# Altium PCB Janus_v1_1.PcbDoc
Units mm, origin at the board's own origin, x right, y up, seen from the top; angles counter-clockwise.
Board outline 71.5 x 35.5 mm, 4 copper layers (Top Layer, GND, Power, Bottom Layer), stack 0.602 mm thick; 100 components, 62 nets, 339 pads, 194 vias.
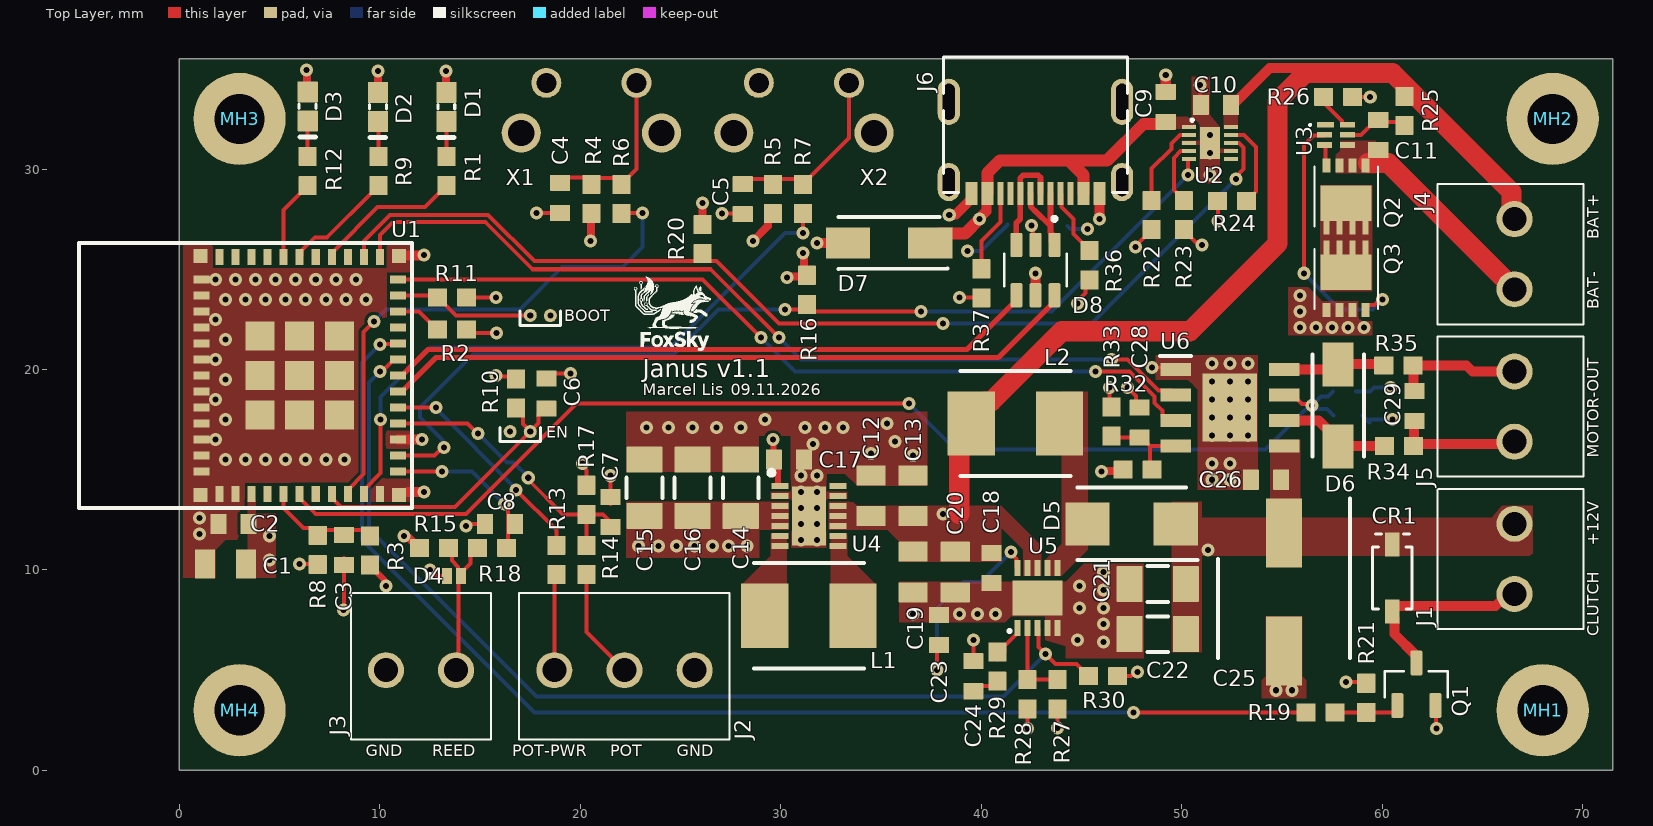
[diagram p0: Top Layer view]
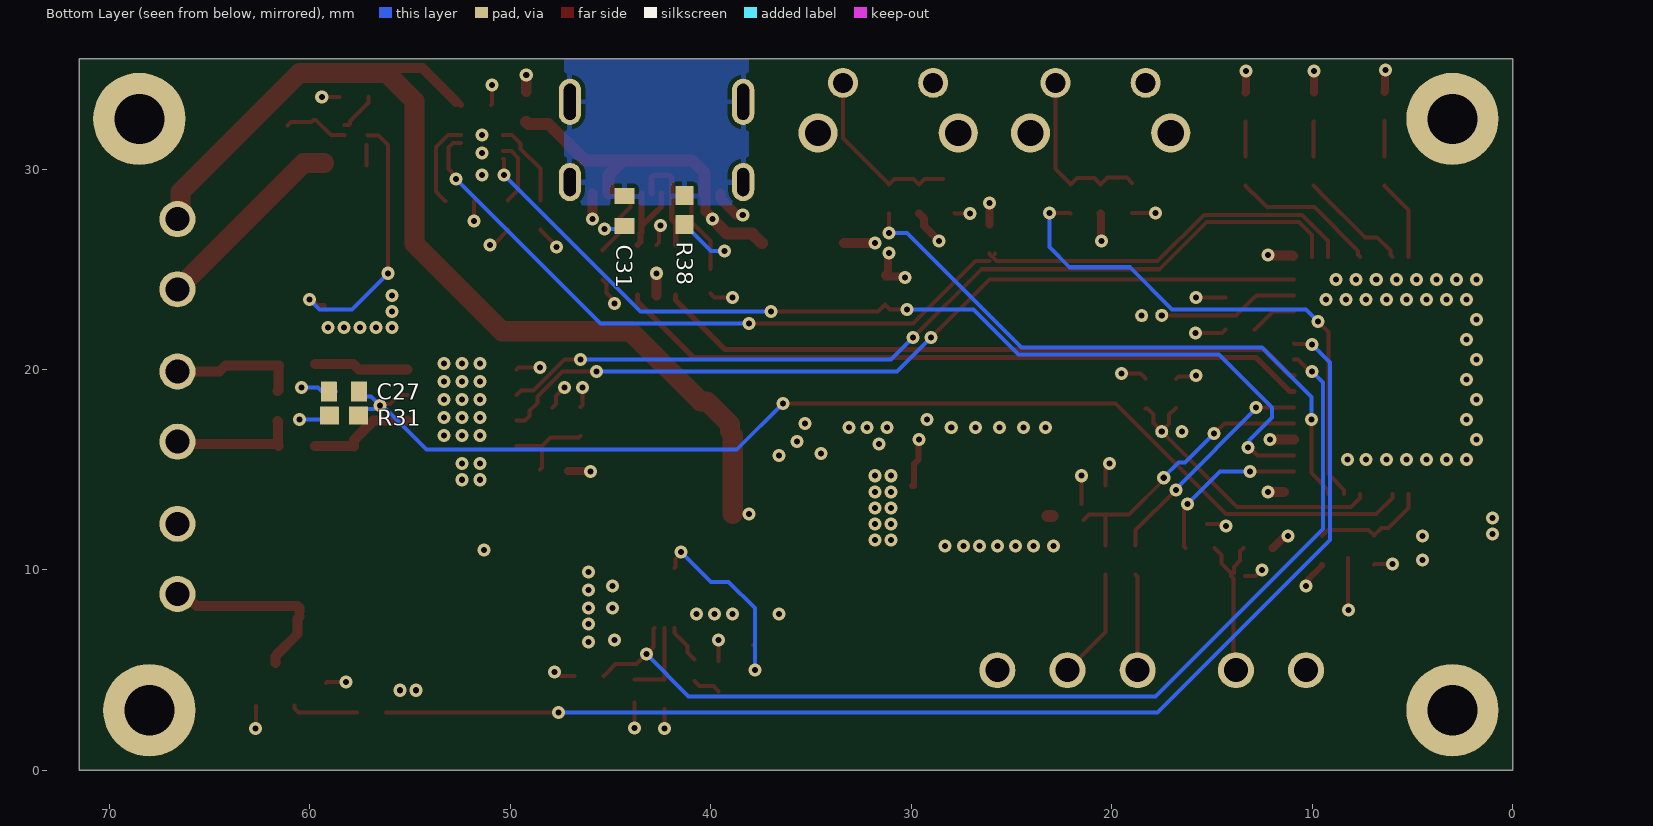
[diagram p1: Bottom Layer view, seen from below]
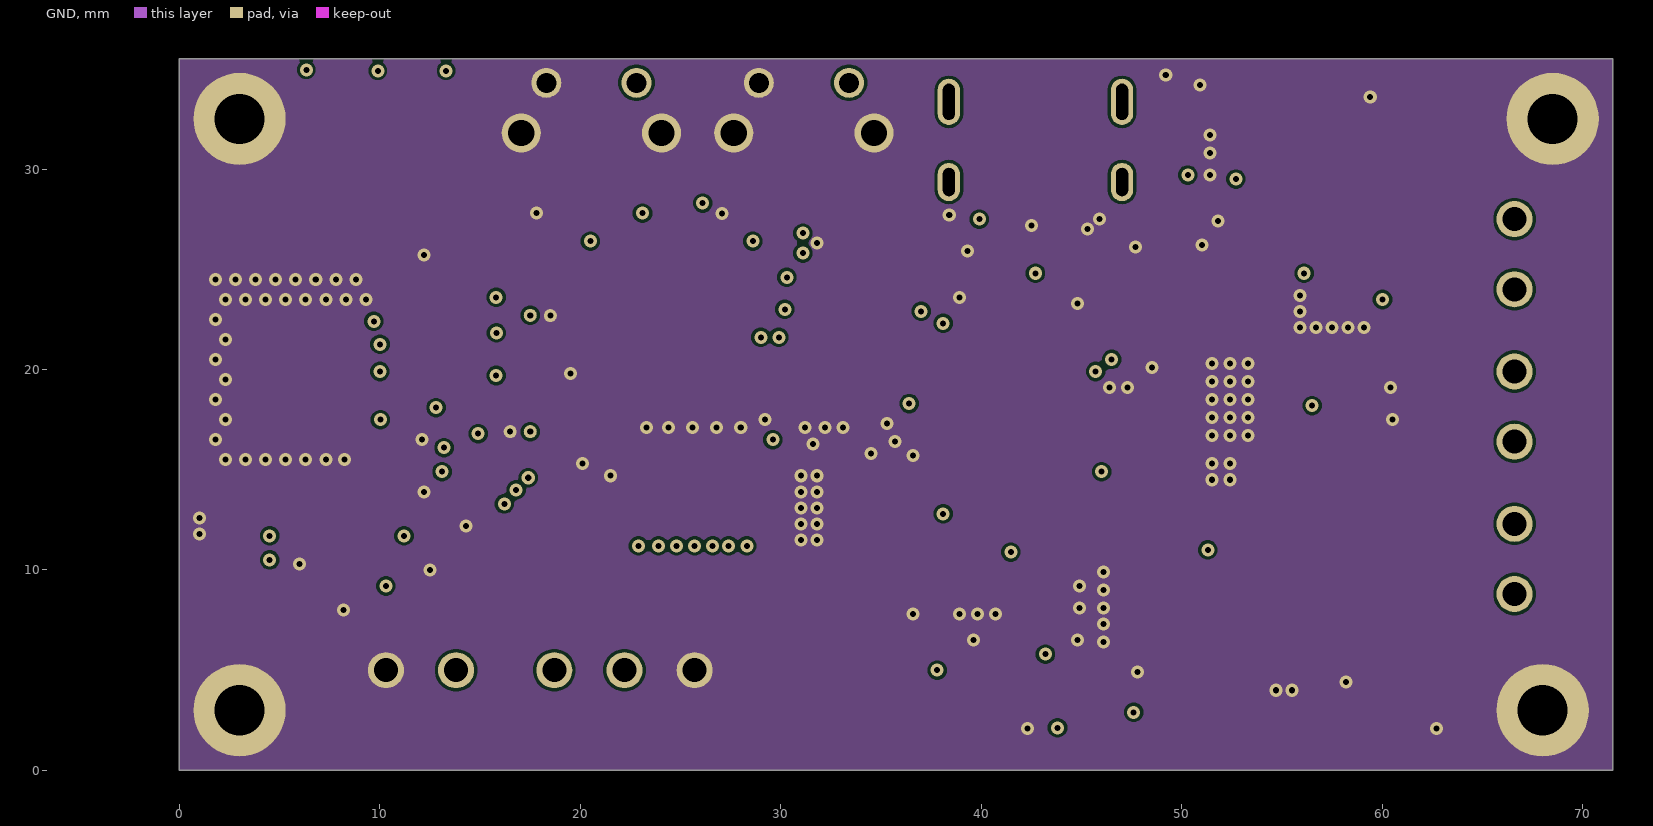
[diagram p2: GND]
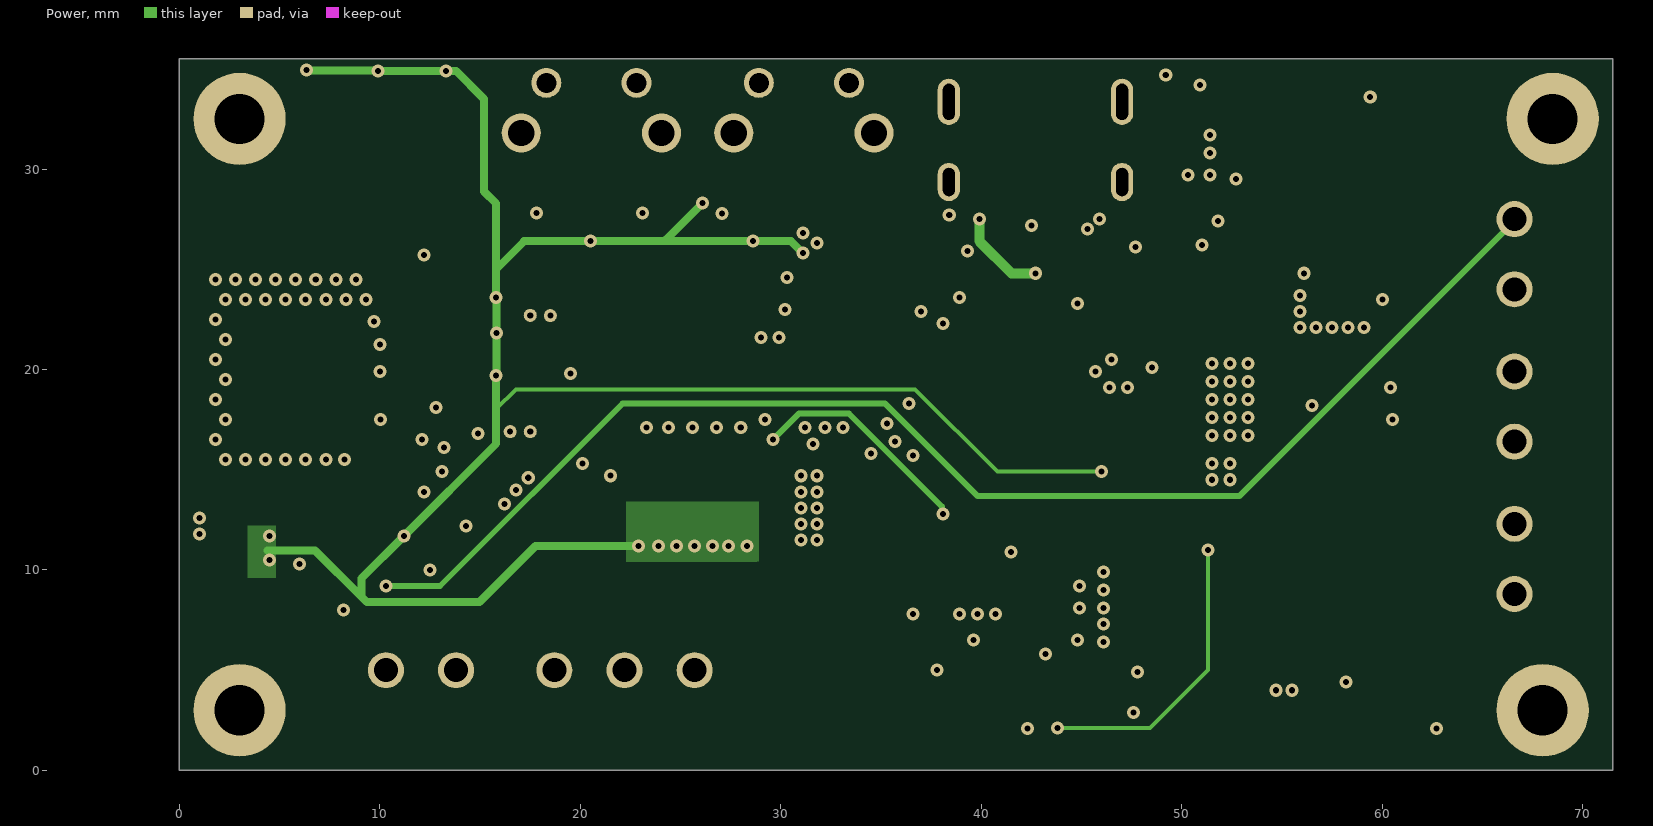
[diagram p3: Power]
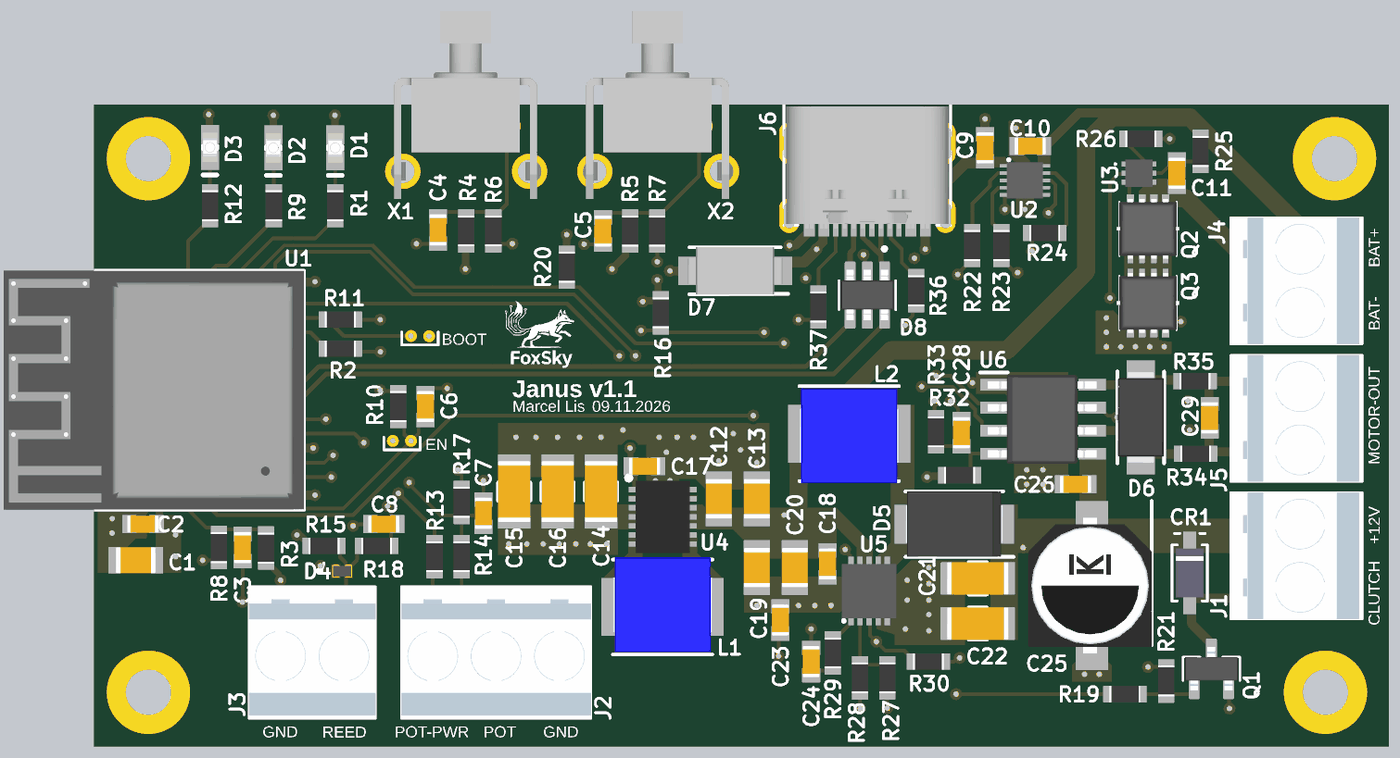
[diagram p4: 3D render of the assembled board from above, using the file's embedded part models]
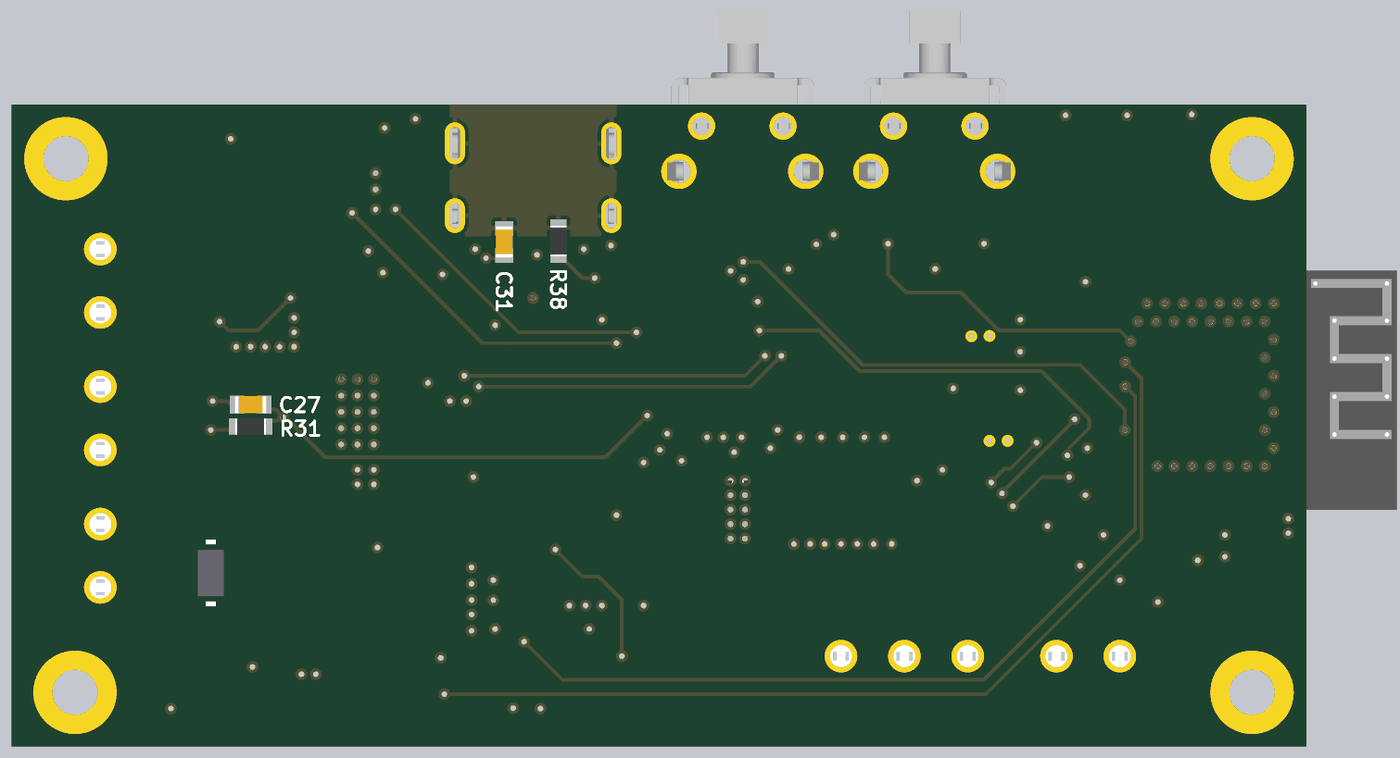
[diagram p5: 3D render of the assembled board from below, using the file's embedded part models]

## Layer stack, top to bottom
Top Solder: solder mask 0.0102, Solder Resist, Dk 3.5
Top Layer: signal copper 0.035
Dielectric 2: prepreg 0.0711, PP-006, Dk 4.1
GND: signal copper 0.035
Dielectric 1: dielectric 0.32, FR-4, Dk 4.8
Power: signal copper 0.035
Dielectric 3: prepreg 0.0711, PP-006, Dk 4.1
Bottom Layer: signal copper 0.035
Bottom Solder: solder mask 0.0102, Solder Resist, Dk 3.5

## Board outline
0,0 0,35.5 71.5,35.5 71.5,0

## Design rules (kind name [scope] priority, off if disabled: settings)
Clearance [All] p1: gap=0.15 ignorepadtopadclearanceinfootprint=TRUE except(0.1: Text-Text Text-Hole)
DiffPairsRouting [InDifferentialPair('USB')] p1: maxlimit=0.203 minlimit=0.203 mostfreqgap=0.203 toplayer_minwidth=0.283 toplayer_maxwidth=0.283 toplayer_prefwidth=0.283 midlayer1_minwidth=0.283 midlayer1_maxwidth=0.283 midlayer1_prefwidth=0.283 midlayer2_minwidth=0.283 midlayer2_maxwidth=0.283 midlayer2_prefwidth=0.283 bottomlayer_minwidth=0.283 bottomlayer_maxwidth=0.283 bottomlayer_prefwidth=0.283 maxuncoupledlength=12.7
PolygonConnect ThermalRelief [InNet('NetC31_2')] p1: thpad.connectstyle=Relief thpad.reliefconductorwidth=0.254 thpad.reliefentries=4 thpad.polygonreliefangle="90 Angle" thpad.airgapwidth=0.2 smdpad.connectstyle=Relief smdpad.reliefconductorwidth=0.254 smdpad.reliefentries=4 smdpad.polygonreliefangle="90 Angle" smdpad.airgapwidth=0.2 via.connectstyle=Direct via.reliefconductorwidth=0.254 via.reliefentries=4 via.polygonreliefangle="90 Angle" via.airgapwidth=0.2
PolygonConnect [All] p2: connectstyle=Direct reliefconductorwidth=0.254 reliefentries=4 polygonreliefangle="90 Angle" airgapwidth=0.254
RoutingVias [All] p1: holewidth=0.3 width=0.65 viastyle="Through Hole" minholewidth=0.3 minwidth=0.65 maxholewidth=0.3 maxwidth=0.65
SolderMaskExpansion SolderMaskExpansion_1 [IsVia] p1: expansion=0 istentingtop=TRUE
SolderMaskExpansion [All] p2: expansion=0 istentingtop=FALSE
SupplyNets "Schematic Supply Nets_5" [InNet('+3V3')] p1: voltage=0.000
SupplyNets "Schematic Supply Nets_4" [InNet('CELL-')] p2: voltage=0.000
SupplyNets "Schematic Supply Nets_3" [InNet('GND')] p3: voltage=0.000
SupplyNets "Schematic Supply Nets_2" [InNet('+12V')] p4: voltage=0.000
SupplyNets "Schematic Supply Nets_1" [InNet('CELL+')] p5: voltage=0.000
SupplyNets "Schematic Supply Nets" [InNet('+V_USB')] p6: voltage=0.000
Width [All] p1: maxlimit=2 minlimit=0.2 preferedwidth=0.2 minimp=50.000000 maximp=50.000000 favimp=50.000000
29 further rules are at their usual default settings.

## Classes and differential pairs
component class USBC_CONNECTOR: C31 D7 D8 J6 R36 R37 R38
component class POWER_SUPPLY: C12 C13 C14 C15 C16 C17 C18 C19 C20 C21 C22 C23 C24 D5 L1 L2 R27 R28 R29 R30 U4 U5
component class POWER_CELL_PROTECTION_AND_CHARGING: C9 C10 C11 J4 Q2 Q3 R22 R23 R24 R25 R26 U2 U3
component class MOTOR_DRIVER: C25 C26 C27 C28 C29 D6 J5 R31 R32 R33 R34 R35 U6
component class MCU: C1 C2 C3 C4 C5 C6 C7 C8 CR1 D1 D2 D3 D4 J1 J2 J3 Q1 R1 R2 R3 R4 R5 R6 R7 R8 R9 R10 R11 R12 R13 R14 R15 R16 R17 R18 R19 R20 R21 U1 X1 X2
component class FoxSky.Janus: MH1 MH2 MH3 MH4
differential pair USB: +USB_P -USB_N

## Components (designator, comment, footprint, x,y, rotation, side; value= is the part's Value field where it differs from the comment)
C1 "10u" C0805 2.3,10.3 r0 top
C2 "100n" C0603 2.7,12.3 r0 top
C3 "100n" C0603 8.2,11 r90 top
C4 "100n" C0603 18.99,28.561 r90 top
C5 "100n" C0603 28.1,28.5 r90 top
C6 "1u" C0603 18.3,18.8 r270 top
C7 "47n" C0603 21.5,12.9 r270 top
C8 "10n" C0603 16,12.3 r0 top
C9 "1u" C0603 49.2,33.1 r270 top
C10 "1u" C0603 51.7,33.2 r0 top
C11 "100n" C0603 59.8,31.7 r90 top
C12 "10u" C0805 34.5,13.7 r270 top
C13 "10u" C0805 36.6,13.7 r270 top
C14 "22u" C1206 28,14.1 r270 top
C15 "22u" C1206 23.2,14.1 r270 top
C16 "22u" C1206 25.6,14.1 r270 top
C17 "100n" C0603 30.4,15.5 r180 top
C18 "1u" C0603 40.5,10.1 r90 top
C19 "10u" C0805 36.6,9.9 r90 top
C20 "10u" C0805 38.7,9.9 r90 top
C21 "22u" C1206 48.8,9.3 r0 top
C22 "22u" C1206 48.8,6.8 r0 top
C23 "100n" C0603 37.9,7 r270 top
C24 "1n2" C0603 39.6,4.7 r270 top
C25 "100u" CAPAE660X800N 55.1,8.9 r270 top
C26 "100n" C0603 54.2,14.5 r0 top
C27 "10n" C0603 58.3,18.9 r180 bottom
C28 "100n" C0603 47.9,17.35 r270 top
C29 "100n" C0603 61.603,18.174 r270 top
C31 "10n" C0603 44.3,27.9 r90 bottom
CR1 "1N4148W-E3-08" CR_48W-E3-08_VIS 60.5,9.6 r270 top
D1 "LED0603" LED0603 13.315,33.1 r90 top
D2 "LED0603" LED0603 9.9,33.1 r90 top
D3 "LED0603" LED0603 6.4,33.125 r90 top
D4 "PESD5V0V1BL_315" DIO_PESD5V0S1UL,315 13.7,9.7 r0 top
D5 "SS24-E3_52T" DIOM5436X244N 47.5,12.3 r180 top
D6 "SMAJ15CA" DIONM5126X265N 57.8,18.2 r270 top
D7 "SMAJ5.0A" DIOM5026X229N 35.4,26.3 r180 top
D8 "USBLC6-2SC6" SOT95P280X145-6N 42.7,24.959 r270 top
J1 "1546551-2" 15465512 66.6,12.3 r270 top
J2 "1546551-3" 15465513 18.7,5 r0 top
J3 "1546551-2" 15465512 13.8,5 r180 top
J4 "1546551-2" 15465512 66.6,27.5 r270 top
J5 "1546551-2" 15465512 66.6,19.9 r270 top
J6 "USB4215-03-A" CONN_8p94X6p5X3p16_12L_GCC 42.7,32.2 r180 top
L1 "SRP5030WA-1R5M" INDPM5552X300N 31.399,7.713 r180 top
L2 "SRP5030WA-3R3M" INDPM5552X300N 41.7,17.3 r0 top
MH1 "M2 Plated Hole" "M2 Plated Hole"#1 65.752,2.311 r0 top
MH2 "M2 Plated Hole" "M2 Plated Hole"#2 71,32.5 r0 top
MH3 "M2 Plated Hole" "M2 Plated Hole"#3 3.7,31.4 r0 top
MH4 "M2 Plated Hole" "M2 Plated Hole"#4 3.4,6.2 r0 top
Q1 "AO3400" SOT95P240X111-3N 61.7,4.3 r90 top
Q2 "CSD17581Q3A" CSD17581Q3A 58.2,28.776 r270 top
Q3 "CSD17581Q3A" CSD17581Q3A 58.2,24.374 r90 top
R1 "330R" R0603 13.315,29.9 r90 top
R2 "10k" R0603 13.6,22 r0 top
R3 "1M" R0603 9.5,10.975 r270 top
R4 "10k" R0603 20.546,28.51 r270 top
R5 "10k" R0603 29.6,28.5 r90 top
R6 "1k" R0603 22.049,28.506 r270 top
R7 "1k" R0603 31.1,28.5 r90 top
R8 "1M" R0603 6.9,11 r90 top
R9 "330R" R0603 9.923,29.9 r90 top
R10 "10k" R0603 16.8,18.8 r90 top
R11 "10k" R0603 13.6,23.6 r0 top
R12 "330R" R0603 6.4,29.9 r90 top
R13 "220R" R0603 18.8,10.5 r270 top
R14 "4k7" R0603 20.3,10.5 r90 top
R15 "1M" R0603 12.7,11.1 r0 top
R16 "100k" R0603 31.3,23.975 r90 top
R17 "1M" R0603 20.3,13.5 r90 top
R18 "10k" R0603 15.6,11.1 r180 top
R19 "100R" R0603 56.925,2.9 r0 top
R20 "100k" R0603 26.1,26.5 r270 top
R21 "100k" R0603 59.2,3.625 r270 top
R22 "1k" R0603 48.5,27.7 r90 top
R23 "2k" R0603 50.1,27.7 r90 top
R24 "10k" R0603 52.5,28.4 r0 top
R25 "330R" R0603 61.1,32.9 r90 top
R26 "2k2" R0603 57.8,33.6 r180 top
R27 "158k" R0603 43.8,3.8 r270 top
R28 "18k" R0603 42.3,3.8 r90 top
R29 "68k" R0603 40.8,5.175 r90 top
R30 "100k" R0603 46.075,4.7 r180 top
R31 "2k7" R0603 58.3,17.7 r180 bottom
R32 "100k" R0603 47.8,15 r180 top
R33 "361k" R0603 46.5,17.4 r270 top
R34 "0R" R0603 60.83,16.18 r0 top
R35 "0R" R0603 60.8,20.2 r0 top
R36 "5k1" R0603 45.4,25.2 r90 top
R37 "5k1" R0603 40,24.3 r90 top
R38 "1M" R0603 41.304,27.95 r90 bottom
U1 "ESP32-C6-MINI-1-H8" ESP32C6MINI1H8 3.3,19.7 r90 top
U2 "BQ24040DSQT" SON40P200X200X80-11N 51.4,31.3 r0 top
U3 "BQ29728DSER" TPS610985DSET 57.7,31.7 r270 top
U4 "TPS63021DSJR" SON50P300X400X100-15N-D 31.4,12.7 r0 top
U5 "TPS61087DSCR" SON50P300X300X80-11N-D 42.8,8.6 r90 top
U6 "DRV8251ADDAR" SOIC127P600X170-9N 52.4,18.1 r0 top
X1 "FSMRACDAH" FSMRACDAH 22.8,34.34 r180 top
X2 "FSMRACDAH" FSMRACDAH 33.4,34.34 r180 top

## Footprints (in the part's own frame and the unit in brackets; to place one, negate y for a bottom-side part, rotate by r counter-clockwise, add the part's x,y. Pads: shape width x height; smd on the part's side, far side on the other; paste and mask are expansions set on the pad)
15465512 [mm]
  round 1.8 hole 1.2: 1(0,0) 2(3.5,0)
  silkscreen extent -1.75,-3.85 5.25,3.45, body extent -1.75,-3.85 5.25,3.45, height 8.51
15465513 [mm]
  round 1.8 hole 1.2: 1(0,0) 2(3.5,0) 3(7,0)
  silkscreen extent -1.75,-3.45 8.75,3.85, body extent -1.75,-3.45 8.75,3.85, height 8.54
C0603 [mm] "Generic 0603 SMD Ceramic Capacitor Footprint"
  rrect5% 0.8x1 smd: 1(-0.75,0) 2(0.75,0)
  body extent -0.87,-0.48 0.87,0.48, height 0.95
C0805 [mm] "Generic 0805 SMD Ceramic Capacitor Footprint"
  rrect5% 1x1.45 smd: 1(-1.016,0) 2(1.016,0)
  body extent -1.1,-0.72 1.1,0.72, height 1.45
C1206 [mm] "Generic 1206 SMD Ceramic Capacitor Footprint"
  rrect5% 1.3x1.8 smd: 1(-1.4,0) 2(1.4,0)
  silkscreen extent -0.5,-0.89 0.5,0.89, body extent -1.7,-0.9 1.7,0.9, height 1.8
CAPAE660X800N [mm]
  rect 3.45x1.8 smd: 1(-2.95,0) 2(2.95,0)
  silkscreen extent -4.67,-3.3 3.3,3.3, body extent -3.75,-3.5 3.75,3.3, height 8.01
CONN_8p94X6p5X3p16_12L_GCC [mm]
  oval 1.108x1.908 hole 0.6 slot 1.4 at 90 deg paste-2539.97 mask+0: 13(-4.32,2.849) 14(4.32,2.849)
  oval 1.108x2.308 hole 0.6 slot 1.8 at 90 deg paste-2539.97 mask+0: 15(-4.32,-1.151) 16(4.32,-1.151)
  rect 0.6x1.15 smd paste+0 mask+0: A1/B12(-3.2,3.424) A4/B9(-2.4,3.424) B1/A12(3.2,3.424) B4/A9(2.4,3.424)
  rect 0.3x1.15 smd paste+0 mask+0: A5(-1.25,3.424) A6(-0.25,3.424) A7(0.25,3.424) A8(1.25,3.424) B5(1.75,3.424) B6(0.75,3.424) B7(-0.75,3.424) B8(-1.75,3.424)
  silkscreen extent -4.6,-3.38 4.6,3.38, body extent -4.47,-3.19 4.47,3.56, height 3.23
CR_48W-E3-08_VIS [mil]
  rect 47.56x28.36 smd paste+0 mask+0: 1(-66,0) 2(66,0)
  silkscreen extent -86,-39 61,39, body extent -73,-31 73,31, height 22
CSD17581Q3A [mm]
  rect 0.7x0.4 smd: 1(-1.402,0.975) 2(-1.402,0.325) 3(-1.402,-0.325) 4(-1.402,-0.975)
  rect 0.685x0.3 smd: 5(1.706,-0.975) 6(1.706,-0.325) 7(1.706,0.325) 8(1.706,0.975)
  rect 1.775x2.55 smd: 9(0.476,0)
  silkscreen extent -1.35,-1.58 1.65,1.58, body extent -1.5,-1.73 1.8,1.73, height 0.9
DIO_PESD5V0S1UL,315 [mm]
  rect 0.5x0.8 smd paste-0.1 mask+0: A(0.35,0) K(-0.35,0)
  silkscreen extent -1.35,-0.1 -1.15,0.1, body extent -0.49,-0.29 0.49,0.29, height 0.5
DIOM5026X229N [mm]
  rect 2.2x1.55 smd: 1(-2.05,0) 2(2.05,0)
  silkscreen extent -2.92,-1.3 2.52,1.3, body extent -2.61,-1.3 2.61,1.3, height 2.33
DIOM5436X244N [mm]
  rect 2.2x2.15 smd: 1(-2.2,0) 2(2.2,0)
  silkscreen extent -3.27,-1.81 2.7,1.81, body extent -2.7,-1.81 2.7,1.81, height 2.44
DIONM5126X265N [mm]
  rect 2.2x1.55 smd: 1(-2.05,0) 2(2.05,0)
  silkscreen extent -2.54,-1.29 2.54,1.29, body extent -2.55,-1.28 2.55,1.28, height 2.34
ESP32C6MINI1H8 [mm]
  rect 0.8x0.4 smd: 1(-5.9,1.3) 2(-5.9,0.5) 3(-5.9,-0.3) 4(-5.9,-1.1) 5(-5.9,-1.9) 6(-5.9,-2.7) 7(-5.9,-3.5) 8(-5.9,-4.3) 9(-5.9,-5.1) 10(-5.9,-5.9) 11(-5.9,-6.7) 25(5.9,-6.7) 26(5.9,-5.9) 27(5.9,-5.1) 28(5.9,-4.3) 29(5.9,-3.5) 30(5.9,-2.7) 31(5.9,-1.9) 32(5.9,-1.1) 33(5.9,-0.3) 34(5.9,0.5) 35(5.9,1.3)
  rect 0.4x0.8 smd: 12(-4.8,-7.6) 13(-4,-7.6) 14(-3.2,-7.6) 15(-2.4,-7.6) 16(-1.6,-7.6) 17(-0.8,-7.6) 18(0,-7.6) 19(0.8,-7.6) 20(1.6,-7.6) 21(2.4,-7.6) 22(3.2,-7.6) 23(4,-7.6) 24(4.8,-7.6) 36(4.8,2.2) 37(4,2.2) 38(3.2,2.2) 39(2.4,2.2) 40(1.6,2.2) 41(0.8,2.2) 42(0,2.2) 43(-0.8,2.2) 44(-1.6,2.2) 45(-2.4,2.2) 46(-3.2,2.2) 47(-4,2.2) 48(-4.8,2.2)
  rect 1.45x1.45 smd: 49(0,-2.7) 54(-1.975,-2.7) 55(-1.975,-4.675) 56(0,-4.675) 57(1.975,-4.675) 58(1.975,-2.7) 59(1.975,-0.725) 60(0,-0.725) 61(-1.975,-0.725)
  rect 0.7x0.7 smd: 50(5.95,2.25) 51(5.95,-7.65) 52(-5.95,-7.65) 53(-5.95,2.25)
  silkscreen extent -6.6,-8.3 6.6,8.3, body extent -6.6,-8.3 6.6,8.3, height 2.55
FSMRACDAH [mm]
  round 1.5 hole 1: 1(0,0.04) 2(4.5,0.04)
  round 1.95 hole 1.3: MH1(-1.25,2.54) MH2(5.75,2.54)
  body extent -1.91,-6.32 6.49,4.06, height 7.01
INDPM5552X300N [mm]
  rect 2.35x3.2 smd: 1(-2.2,0) 2(2.2,0)
  silkscreen extent -2.75,-2.63 2.75,2.63, body extent -2.75,-2.75 2.75,2.5, height 3
LED0603 [mm] "0603 LED footprint"
  rrect5% 1.05x1 smd: A(0.725,0) K(-0.725,0)
  silkscreen extent -1.52,-0.42 0.11,0.43, body extent -0.81,-0.41 0.81,0.41, height 0.95
"M2 Plated Hole"#1 [mm]
  round 4.6 hole 2.5 mask+0: 1(2.248,0.689)
"M2 Plated Hole"#2 [mm]
  round 4.6 hole 2.5 mask+0: 1(-2.5,0)
"M2 Plated Hole"#3 [mm]
  round 4.6 hole 2.5 mask+0: 1(-0.7,1.1)
"M2 Plated Hole"#4 [mm]
  round 4.6 hole 2.5 mask+0: 1(-0.4,-3.2)
R0603 [mm] "Generic 0603 Resistor Footprint"
  rrect5% 0.95x0.9 smd: 1(-0.725,0) 2(0.725,0)
  body extent -0.85,-0.45 0.85,0.45, height 0.55
SOIC127P600X170-9N [mm]
  rect 1.525x0.65 smd: 1(-2.712,1.905) 2(-2.712,0.635) 3(-2.712,-0.635) 4(-2.712,-1.905) 5(2.712,-1.905) 6(2.712,-0.635) 7(2.712,0.635) 8(2.712,1.905)
  rect 2.71x3.4 smd: 9(0,0)
  silkscreen extent -3.47,2.58 -1.95,2.58, body extent -3.06,-2.46 2.96,2.44, height 1.57
SON40P200X200X80-11N [mm]
  rect 0.7x0.2 smd: 1(-1.05,0.8) 2(-1.05,0.4) 3(-1.05,0) 4(-1.05,-0.4) 5(-1.05,-0.8) 6(1.05,-0.8) 7(1.05,-0.4) 8(1.05,0) 9(1.05,0.4) 10(1.05,0.8)
  rect 1x1.6 smd: 11(0,0)
  silkscreen extent -0.9,1.13 -0.88,1.16, body extent -1,-1 1,1, height 0.8
SON50P300X300X80-11N-D [mm]
  rect 0.8x0.3 smd: 1(-1.5,1) 2(-1.5,0.5) 3(-1.5,0) 4(-1.5,-0.5) 5(-1.5,-1) 6(1.5,-1) 7(1.5,-0.5) 8(1.5,0) 9(1.5,0.5) 10(1.5,1)
  rect 1.75x2.5 smd: 11(0,0)
  silkscreen extent -1.68,1.37 -1.63,1.42, body extent -1.5,-1.5 1.5,1.5, height 0.8
SON50P300X400X100-15N-D [mm]
  rect 0.85x0.3 smd: 1(-1.45,1.5) 2(-1.45,1) 3(-1.45,0.5) 4(-1.45,0) 5(-1.45,-0.5) 6(-1.45,-1) 7(-1.45,-1.5) 8(1.45,-1.5) 9(1.45,-1) 10(1.45,-0.5) 11(1.45,0) 12(1.45,0.5) 13(1.45,1) 14(1.45,1.5)
  rect 1.68x2.95 smd: 15(0,0)
  silkscreen extent -2,2.03 -1.75,2.27, body extent -1.5,-2 1.5,2, height 1
SOT95P240X111-3N [mm]
  rrect25% 1.23x0.6 smd: 1(-1.06,0.95) 2(-1.06,-0.95) 3(1.06,0)
  silkscreen extent -0.65,-1.57 0.65,1.57, body extent -1.2,-1.45 1.2,1.45, height 1.11
SOT95P280X145-6N [mm]
  rrect25% 1.21x0.59 smd: 1(-1.255,0.95) 2(-1.255,0) 3(-1.255,-0.95) 4(1.255,-0.95) 5(1.255,0) 6(1.255,0.95)
  silkscreen extent -2.65,-1.57 0.81,1.57, body extent -1.4,-1.46 1.4,1.46, height 1.42
TPS610985DSET [mm]
  rect 0.28x0.85 smd: 1(-0.5,-0.525)
  rect 0.28x0.75 smd: 2(0,-0.575) 3(0.5,-0.575) 4(0.5,0.575) 5(0,0.575) 6(-0.5,0.575)
  silkscreen extent -0.55,-1.35 -0.45,-1.25, body extent -0.75,-0.75 0.75,0.75, height 0.79

## Part data
C1 C12 C13 C19 C20: library part CMP-00025-5, "Generic 0805 SMD Ceramic Capacitor"
C2 C3 C4 C5 C6 C7 C8 C9 C10 C11 C17 C18 C23 C24 C26 C27 C28 C29 C31: library part CMP-00024-8, "Generic 0603 SMD Ceramic Capacitor"
C14 C15 C16 C21 C22: library part CMP-00026-7, "Generic 1206 SMD Ceramic Capacitor"
C25: library part EDK107M025A9HAA, "Surface Mount, Aluminum Electrolytic", Manufacturer_Name="Yageo Group", Mouser Part Number=80-EDK107M025A9HAA, Datasheet Link=https://www.yageogroup.com/content/datasheet/asset/file/KEM_A4001_EDK, Geometry.Height=8mm, Manufacturer_Part_Number=EDK107M025A9HAA, Mouser Price/Stock=https://www.mouser.co.uk/ProductDetail/KEMET/EDK107M025A9HAA?qs=T9vdlufmP8yf8os%252BKCOQGA%3D%3D
CR1: "SWITCHING DIODE GENPURP SOD123_A", Manufacturer_Name=Vishay, Copyright="Copyright (C) 2026 Ultra Librarian. All rights reserved.", Manufacturer_Part_Number=1N4148W-E3-08
D1 D2 D3: library part CMP-00036-7, "0603 LED"
D4: "12.5V Clamp 4.8A (8/20µs) Ipp Tvs Diode Surface Mount DFN1006-2"
D5: "Schottky Diodes & Rectifiers 2.0 Amp 40 Volt", Manufacturer_Name=Vishay, Manufacturer_Part_Number=SS24-E3/52T, Mouser Part Number=625-SS24-E3, Datasheet Link=https://www.vishay.com/docs/88748/ss22.pdf, Geometry.Height=2.44mm, Mouser Price/Stock=https://www.mouser.co.uk/ProductDetail/Vishay-General-Semiconductor/SS24-E3-52T?qs=x2jpVgRnAtP8XbmaoIr%252Bng%3D%3D
D6: "TVS Diode Bi-Directional SMAJ15CA-TR 32.5V, 400W, SMA 2-Pin", Package="DO-214AB Taiwan Semiconductor Corporation", Availability="In Stock", Check_prices=https://www.snapeda.com/parts/SMCJ15CA%20V7G/Taiwan+Semiconductor/view-part/?ref=eda, MF="Taiwan Semiconductor", MP="SMCJ15CA V7G", Price=None, Purchase-URL="https://pricing.snapeda.com/search/part/SMCJ15CA V7G/?ref=eda", SnapEDA_Link=https://www.snapeda.com/parts/SMCJ15CA%20V7G/Taiwan+Semiconductor/view-part/?ref=snap
D7: "BOURNS - SMAJ5.0A - TVS Diode, TRANSZORB SMAJ Series, Unidirectional, 5 V, 9.2 V, DO-214AC (SMA), 2 Pins", Manufacturer_Name=Bourns, Mouser Part Number=652-SMAJ5.0A, Datasheet Link=https://detail.tmall.com/item.htm?id=548354020241&ali_refid=a3_430583_1006:1109983619:N:3Uw9kZ3UMDT/QL57nh1fXA==:ab063b49c94624768a940a913313feb0&ali_trackid=1_ab063b49c94624768a940a913313feb0&spm=a230r.1.14.1, Geometry.Height=2.29mm, Manufacturer_Part_Number=SMAJ5.0A, Mouser Price/Stock=https://www.mouser.co.uk/ProductDetail/Bourns/SMAJ5.0A?qs=A3H9pljuJ8RbLIvzFxDfUA%3D%3D
D8: "17V Clamp 5A (8/20Âµs) Ipp Tvs Diode Surface Mount SOT-23-6", Package="SOT-23-6 STMicroelectronics", Availability="In Stock", Check_prices=https://www.snapeda.com/parts/USBLC6-2SC6/STMicroelectronics/view-part/?ref=eda, MF=STMicroelectronics, MP=USBLC6-2SC6, Price=None, Purchase-URL=https://pricing.snapeda.com/search/part/USBLC6-2SC6/?ref=eda, SnapEDA_Link=https://www.snapeda.com/parts/USBLC6-2SC6/STMicroelectronics/view-part/?ref=snap
J1 J3 J4 J5: "Body Features: Product Orientation Vertical", Manufacturer_Name="TE Connectivity", Mouser Part Number=571-1546551-2, Datasheet Link=https://www.te.com/commerce/DocumentDelivery/DDEController?Action=srchrtrv&DocNm=1-1773458-1_EURO_STYLE_QRG&DocType=Data%20Sheet&DocLang=English&PartCntxt=1546551-2&DocFormat=pdf, Geometry.Height=8.5mm, Manufacturer_Part_Number=1546551-2, Mouser Price/Stock=https://www.mouser.co.uk/ProductDetail/TE-Connectivity/1546551-2?qs=m%2FhmcwQ75LmjcSTRMY1QVQ%3D%3D
J2: "TERMI-BLOK PCB MOUNT 3P", Package=None, Availability=Unavailable, MP=282837-3, Price=None
J6: "Description", Manufacturer_Name="Global Connector Technology", Copyright="Copyright (C) 2026 Ultra Librarian. All rights reserved.", Manufacturer_Part_Number=USB4215-03-A, RefDes=RefDes, Type=Type
L1: "Ind,5.5x5.25x2.8mm,1.5uH+/-20%,8.5A,shd", Manufacturer_Name=Bourns, Mouser Part Number=652-SRP5030WA-1R5M, Datasheet Link=https://g.componentsearchengine.com/Datasheets/0/17601778.pdf, Geometry.Height=3mm, Manufacturer_Part_Number=SRP5030WA-1R5M, Mouser Price/Stock=https://www.mouser.co.uk/ProductDetail/Bourns/SRP5030WA-1R5M?qs=9vOqFld9vZVU1hSpR6NGrg%3D%3D
L2: "Ind,5.5x5.25x2.8mm,3.3uH+/-20%,6A,shd", Manufacturer_Name=Bourns, Mouser Part Number=652-SRP5030WA-3R3M, Datasheet Link=https://www.bourns.com/docs/Product-Datasheets/SRP5030WA.pdf, Geometry.Height=3mm, Manufacturer_Part_Number=SRP5030WA-3R3M, Mouser Price/Stock=https://www.mouser.co.uk/ProductDetail/Bourns/SRP5030WA-3R3M?qs=9vOqFld9vZVo7qWb%252BEg6NA%3D%3D
MH1 MH2 MH3 MH4: library part CONN-00089-1, Manufacturer=Molex
Q1: "N-Channel 30 V 5.8A (Ta) 1.4W (Ta) Surface Mount SOT-23-3"
Q2 Q3: "30-V, N channel NexFET power MOSFET, single SON 3 mm x 3 mm, 4.7 mOhm", Manufacturer_Name="Texas Instruments", Mouser Part Number=595-CSD17581Q3A, Datasheet Link=https://www.ti.com/product/CSD17581Q3A?utm_source=google&utm_medium=cpc&utm_campaign=app-null-null-GPN_EN-cpc-pf-google-soas_en_cons&utm_content=CSD17581Q3A&ds_k=CSD17581Q3A&DCM=yes&gclsrc=aw.ds&gad_source=1&gad_campaignid=8753799319&gbraid=0AAAAAC068F0J1, Geometry.Height=0.9mm, Manufacturer_Part_Number=CSD17581Q3A, Mouser Price/Stock=https://www.mouser.co.uk/ProductDetail/Texas-Instruments/CSD17581Q3A?qs=%2FP2Ij7fVdhEBu0ceoVBClg%3D%3D
R1 R2 R3 R4 R5 R6 R7 R8 R9 R10 R11 R12 R13 R14 R15 R16 R17 R18 R19 R20 R21 R22 R23 R24 R25 R26 R27 R28 R29 R30 R31 R32 R33 R34 R35 R36 R37 R38: library part CMP-00017-10, "Generic 0603 SMD Resistor"
U1: "8 MB (Quad SPI) , 13.2  16.6  2.4 , 3.0 ~ 3.6 V , 2.4 GHz , 2412 ~ 2484 MHz , 40C ~ 105C", Manufacturer_Name="Espressif Systems", Mouser Part Number=356-ESP32C6MINI1H8, Datasheet Link=https://www.mouser.ph/ProductDetail/Espressif-Systems/ESP32-C6-MINI-1-H8?qs=olJun0bQHM8q1UR%2FHSWi2A%3D%3D, Geometry.Height=2.55mm, Manufacturer_Part_Number=ESP32-C6-MINI-1-H8, Mouser Price/Stock=https://www.mouser.co.uk/ProductDetail/Espressif-Systems/ESP32-C6-MINI-1-H8?qs=olJun0bQHM8q1UR%2FHSWi2A%3D%3D
U2: "1A 1-Cell Li-Ion Battery Charger WSON10 Texas Instruments BQ24040DSQT, Battery Charge Controller, 1000mA, 10-Pin SON", Manufacturer_Name="Texas Instruments", Mouser Part Number=595-BQ24040DSQT, Datasheet Link=http://www.ti.com/lit/ds/symlink/bq24040.pdf, Geometry.Height=0.8mm, Manufacturer_Part_Number=BQ24040DSQT, Mouser Price/Stock=https://www.mouser.co.uk/ProductDetail/Texas-Instruments/BQ24040DSQT?qs=c7TMWs5treRrgyn%2F898iNQ%3D%3D
U3: "PCM IC", Arrow Part Number=BQ29707DSET, Manufacturer_Name="Texas Instruments", Mouser Part Number=595-BQ29707DSET, Arrow Price/Stock=https://www.arrow.com/en/products/bq29707dset/texas-instruments.html?utm_currency=USD&region=nac, Datasheet Link=http://www.ti.com/lit/ds/symlink/bq2970.pdf, Height=0.8mm, Manufacturer_Part_Number=BQ29707DSET, Mouser Price/Stock=https://www.mouser.co.uk/ProductDetail/Texas-Instruments/BQ29707DSET?qs=7z%252BmIopC6%2FK8PFHAGER5Bg%3D%3D
U4: "High Efficiency Single Inductor Buck-Boost Converter with 4A Switch", Manufacturer_Name="Texas Instruments", Mouser Part Number=595-TPS63021DSJR, Datasheet Link=http://www.ti.com/lit/gpn/tps63021, Geometry.Height=1mm, Manufacturer_Part_Number=TPS63021DSJR, Mouser Price/Stock=https://www.mouser.co.uk/ProductDetail/Texas-Instruments/TPS63021DSJR?qs=C44r%252BX3hXgL5uT9uesn8fg%3D%3D
U5: "Conv DC-DC 2.5V to 6V Non-Inv/Inv/Step Up/Step Down Single-Out 3V to 18.5V 3.2A 10-Pin WSON EP T/R", Manufacturer_Name="Texas Instruments", Mouser Part Number=595-TPS61087DSCR, Datasheet Link=http://www.ti.com/lit/gpn/tps61087, Geometry.Height=0.8mm, Manufacturer_Part_Number=TPS61087DSCR, Mouser Price/Stock=https://www.mouser.co.uk/ProductDetail/Texas-Instruments/TPS61087DSCR?qs=bS0R8qMSxJOWmsgAbsl9FQ%3D%3D
U6: "Motor Drives 48-V, 3.5-A H bridge motor driver with current regulation and current sense feedback", Manufacturer_Name="Texas Instruments", Mouser Part Number=595-DRV8251ADDAR, Datasheet Link=https://www.arrow.com/en/products/drv8251addar/texas-instruments?region=nac, Geometry.Height=1.7mm, Manufacturer_Part_Number=DRV8251ADDAR, Mouser Price/Stock=https://www.mouser.co.uk/ProductDetail/Texas-Instruments/DRV8251ADDAR?qs=MyNHzdoqoQKQYZTe%252B1jFCw%3D%3D
X1 X2: "TE CONNECTIVITY / ALCOSWITCH - FSMRACDAH - TACTILE SWITCH, SPST-NO, 0.05A, 24V, TH", Manufacturer_Name="TE Connectivity", Mouser Part Number=506-FSMRACDAH, Datasheet Link=https://www.te.com/commerce/DocumentDelivery/DDEController?Action=showdoc&DocId=Customer+Drawing%7F1825968%7FB1%7Fpdf%7FEnglish%7FENG_CD_1825968_B1.pdf%7F1825968-2, Geometry.Height=9.2mm, Manufacturer_Part_Number=FSMRACDAH, Mouser Price/Stock=https://www.mouser.co.uk/ProductDetail/TE-Connectivity-Alcoswitch/FSMRACDAH?qs=GXuM9q1TrDlqFSLkwG2zzQ%3D%3D

## Free pads (board coordinates)
  round 0.65 hole 0.3: 5(16.5,16.9) 5(17.5,16.9) 5(17.5,22.7) 5(18.5,22.684)

## Via types
v1: diameter 0.65, hole 0.3, Top Layer to Bottom Layer, tented both sides, 194 vias

## Nets (pads, with @x,y where several pads share a name; then routed paths per layer and width w, separated by ;. In a path a pad name is that pad's centre, name@x,y a point inside that pad or via, vN(x,y) a via of type N, cw(c..) or ccw(c..) an arc to the next point about the centre after c; other vN are vias at no path point)
+3V3: C1.2 C2.2 C14.2 C15.2 C16.2 D1.A D2.A D3.A R2.2 R4.2 R5.1 R10.2 R11.2 R15.1 R16.2 R20.1 R32.2 U1.3 U4.3 U4.4 U4.5 | length 125.4
  Top Layer w0.2: R2.2 14.5,21.825 v1(15.812,21.825) ; R11.2 v1(15.8,23.6) ; v1(15.8,19.7) 15.848,19.652 16.673,19.652 R10.2
  Top Layer w0.4: v1(6.33,34.944) 6.365,34.909 6.365,33.885 D3.A ; D2.A v1(9.9,34.9) ; v1(11.202,11.698) 11.25,11.65 11.4,11.65 11.95,11.1 R15.1 ; v1(13.3,34.9) 13.308,34.892 13.308,33.833 D1.A ; v1(20.5,26.4) 20.523,26.423 20.523,27.762 R4.2 ; R20.1 v1(26.1,28.3) ; v1(28.6,26.4) 29.35,27.15 29.35,27.525 R5.1 ; v1(30.3,24.6) 30.348,24.648 31.248,24.648 R16.2 31.148,24.852 31.148,25.752 v1(31.1,25.8) ; v1(46,14.9) 46.048,14.948 R32.2@47.115,14.948
  Top Layer w0.6: C15.2@22.95,12.7 C15.2
  Power w0.2: 15.8,18.019 16.781,19 36.7,19 40.8,14.9 v1(46,14.9)
  Power w0.4: 4.4,10.975 6.77,10.975 9.073,8.673 ; v1(6.33,34.944) 6.352,34.922 9.878,34.922 v1(9.9,34.9) v1(13.3,34.9) 13.8,34.9 15.2,33.5 15.2,28.884 15.8,28.284 15.8,25 ; v1@15.806,21.825 15.806,23.594 v1(15.8,23.6) 15.8,25 ; v1(15.812,21.825) 15.806,21.819 15.806,19.706 v1(15.8,19.7) 15.8,18.019 15.8,16.3 11.202,11.702 v1(11.202,11.698) 11.198,11.698 9.073,9.573 9.073,8.673 ; v1(22.9,11.2) 17.764,11.2 14.964,8.4 9.345,8.4 9.073,8.673 ; v1(26.1,28.3) 24.3,26.5 24.3,26.4 ; v1(31.1,25.8) 30.5,26.4 v1(28.6,26.4) 24.3,26.4 ; 15.8,25 17.2,26.4 v1(20.5,26.4) 24.3,26.4
  other v1: 4.5,10.5 23.9,11.2 24.8,11.2 25.7,11.2 26.6,11.2 27.4,11.2 28.3,11.2 4.5,11.7
+12V: C21.2 C22.2 C25.1 C26.2 CR1.1 D5.1 J1.1 R27.2 U6.5 | length 16
  Top Layer w0.2: v1(43.8,2.125) R27.2@43.8,3.4
  Power w0.2: v1(43.8,2.125) 48.425,2.125 51.3,5 v1(51.3,11)
+V_USB: C9.2 D7.1 D8.5 J6.A4/B9 J6.B4/A9 U2.1 | length 23
  Top Layer w0.5: v1(39.9,27.5) 39.9,27.541 40.25,27.891 40.25,28.726 J6.B4/A9 ; D8.5 v1(42.7,24.8)
  Top Layer w0.6: D7.1 37.925,26.775 39.189,26.775 39.9,27.486 v1(39.9,27.5) ; J6.B4/A9 40.3,29.8 40.923,30.423 44.377,30.423 ; J6.A4/B9 45.1,29.7 44.377,30.423 ; C9.2 49.1,32.25 48.099,32.25 46.272,30.423 44.377,30.423
  Power w0.5: v1(39.9,27.5) 39.9,26.4 41.5,24.8 v1(42.7,24.8)
BOOT: pad.5@17.5,22.7 R11.1 U1.23 | length 7
  Top Layer w0.2: U1.23 12.775,23.7 R11.1 12.9,23.6 13.8,22.7 pad.5@17.5,22.7
BUTTON1: R6.2 U1.9 | length 26.8
  Top Layer w0.2: U1.9 8.4,14 9.175,14.775 9.175,21.875 v1(9.7,22.4) ; R6.2 22.068,27.8 v1(23.1,27.8)
  Bottom Layer w0.2: v1(9.7,22.4) 10.3,23 16.987,23 19.087,25.1 22.1,25.1 23.1,26.1 v1(23.1,27.8)
BUTTON2: R7.1 U1.10 | length 30.6
  Top Layer w0.2: U1.10 9.2,14 10.025,14.825 v1(10.025,17.5) ; v1(31.1,26.8) R7.1
  Bottom Layer w0.2: v1(10.025,17.5) 10.025,18.625 12.5,21.1 24.5,21.1 30.2,26.8 v1(31.1,26.8)
CELL+: C10.2 C12.2 C13.2 C17.2 C18.2 C19.2 C20.2 J4.1 L2.1 R3.2 R25.2 U2.10 U4.1 U4.10 U4.11 U4.12 U5.8 U5.9 | length 134.7
  Top Layer w0.3: R3.2 9.5,10.225 10.233,9.492 10.233,9.267 v1(10.3,9.2) ; v1(29.6,16.5) 29.625,16.475 29.625,15.525 29.869,15.281 29.869,14.2 U4.1 ; C10.2 52.6,33.35 C10.2@52.7,33.35
  Top Layer w0.5: C10.2@52.7,33.35 54.385,35.035 56.571,35.035
  Top Layer w1: 38.9,12.787 L2.1@38.9,16.7 ; L2.1@39.029,16.929 39.029,17.254 40.175,18.4 40.5,18.4 44.007,21.907 50.407,21.907 54.776,26.276 54.776,33.389 56.174,34.786 60.514,34.786 66.447,28.853 66.447,27.653 J4.1
  Power w0.3: v1(10.3,9.2) 13,9.2 22.1,18.3 35.2,18.3 39.8,13.7 52.884,13.7 66.6,27.416 J4.1 ; v1(29.6,16.5) 30.9,17.8 33.4,17.8 38.033,13.167 38.033,12.867 v1(38.1,12.8)
CELL-: C11.1 J4.2 Q2.1 Q2.2 Q2.3 U3.4 | length 9.9
  Top Layer w1: Q2.1@59.299,30.302 60.298,30.302 J4.2
CHG_STAT: R20.2 U1.26 U2.8 | length 52.7
  Top Layer w0.2: U1.26 9.2,26.4 10.5,27.7 15.4,27.7 17.7,25.4 25.75,25.4 26.1,25.75 R20.2 ; R20.2@25.825,25.75 R20.2@25.825,25.775 ; R20.2@26.1,25.4 26.8,25.4 29.9,22.3 v1(38.1,22.302) v1(38.1,22.302) ; U2.8 52.854,31.3 53.089,31.065 53.089,29.995 52.7,29.606 v1(52.7,29.5)
  Bottom Layer w0.2: v1(38.1,22.302) 45.502,22.302 v1(52.7,29.5)
COUT: Q3.4 U3.2 | length 13.6
  Top Layer w0.2: v1(56.1,24.8) 56.1,31.2 56.56,31.66 57.085,31.66 U3.2 ; Q3.4 59.275,23.072 59.275,23.222 59.62,23.222 59.89,23.492 v1(60.012,23.492)
  Bottom Layer w0.2: v1(56.1,24.8) 57.9,23 59.52,23 v1(60.012,23.492)
DOUT: Q2.4 U3.3 | length 1
  Top Layer w0.2: Q2.4@57.172,30.178 U3.3@57.172,31.187
EN: C6.2 pad.5@17.5,16.9 R10.1 U1.8 | length 14.8
  Top Layer w0.2: U1.8 7.6,13.6 8.05,13.15 13.75,13.15 pad.5@17.5,16.9 ; R10.1 17.127,17.747 17.127,17.273 pad.5@17.5,16.9 ; C6.2 18.22,18.05 17.92,17.75 17.92,17.32 pad.5@17.5,16.9
GND: C1.1 C2.1 C3.1 C4.1 C5.1 C6.1 C7.1 C8.1 C9.1 C10.1 C12.1 C13.1 C14.1 C15.1 C16.1 C17.1 C18.1 C19.1 C20.1 C21.1 C22.1 C23.1 C24.1 C25.2 C26.1 C27.1 C28.1 C31.1 D4.K D7.2 D8.2 J2.3 J3.2 J6.A1/B12 J6.B1/A12 MH1.1 MH2.1 MH3.1 MH4.1 pad.5@16.5,16.9 pad.5@18.5,22.684 Q1.2 Q3.1 Q3.2 Q3.3 R8.1 R17.2 R21.1 R22.1 R23.1 R24.1 R26.1 R28.1 R30.1 R31.1 R33.1 R36.1 R37.1 R38.1 U1.1 U1.2 U1.11 U1.14 U1.36 U1.37 U1.38 U1.39 U1.40 U1.41 U1.42 U1.43 U1.44 U1.45 U1.46 U1.47 U1.48 U1.49 U1.50 U1.51 U1.52 U1.53 U1.54 U1.55 U1.56 U1.57 U1.58 U1.59 U1.60 U1.61 U2.3 U2.7 U2.11 U4.2 U4.13 U4.15 U5.4 U5.5 U5.11 U6.1 U6.9 X1.2 X1.MH1 X1.MH2 X2.2 X2.MH1 X2.MH2 | length 44.9
  Top Layer w0.2: v1(6,10.3) 6.875,10.3 R8.1 ; v1(8.195,7.995) 8.2,8 C3.1 C3.1@8.2,10.6 ; v1(12.5,10) 12.525,10 12.825,9.7 D4.K ; v1(14.3,12.2) 14.383,12.283 C8.1@15.25,12.283 ; v1(17.8,27.8) 18.979,27.8 C4.1 ; C6.1 18.55,19.8 v1(19.5,19.8) ; v1(20.1,15.3) 20.1,15.178 20.3,14.978 R17.2 ; C7.1@21.5,13.3 v1(21.5,14.7) ; v1(27.062,27.772) 27.822,27.772 C5.1@27.85,27.8 ; v1(38.9,23.6) 39.8,23.6 R37.1@40,23.8 ; C24.1 v1(39.6,6.5) ; v1(42.3,2.1) R28.1 ; v1(42.492,27.186) 42.578,27.1 42.578,26.336 D8.2 ; v1(44.8,23.3) 44.8,23.422 45.195,23.817 45.195,24.27 R36.1 ; v1(46.4,19.1) 46.4,18.225 R33.1 ; R30.1 47.478,4.7 47.678,4.9 v1(47.8,4.9) ; v1(47.3,19.1) 47.717,18.683 47.717,18.283 C28.1 ; v1(47.7,26.1) 47.7,26.15 48.5,26.95 R22.1 ; v1(48.507,20.107) 49.586,20.107 U6.1 ; R23.1 50.1,26.95 50.764,26.286 50.914,26.286 v1(51,26.2) ; v1(50.9,34.2) 50.9,33.25 C10.1 ; R24.1 51.8,28.375 v1(51.8,27.4) ; v1(58.2,4.4) 59.15,4.4 R21.1 ; R26.1 v1(59.4,33.6) ; Q1.2@62.675,3.215 62.675,2.125 v1(62.7,2.1)
  Top Layer w0.5: U1.14 v1(12.1,16.5) ; U1.51 10.975,25.675 12.175,25.675 v1(12.2,25.7) ; 11.4,13.9 v1(12.2,13.9) ; v1(31.8,26.3) D7.2 ; v1(38.4,27.7) 38.429,27.729 38.728,27.729 39.5,28.501 J6.B1/A12 ; v1(45.9,27.5) J6.A1/B12 ; C9.1 v1(49.2,34.7)
  Bottom Layer w0.2: v1(39.3,25.9) 39.979,25.9 40.929,26.85 40.954,26.85 41.304,27.2 R38.1 ; C31.1 44.45,27 v1(45.3,27) ; C27.1@58.7,18.9 59.389,18.9 59.589,19.1 v1(60.4,19.1) ; R31.1 59.375,17.35 59.375,17.475 59.4,17.5 v1(60.5,17.5)
  other v1: 54.7,4 55.5,4 46.1,6.4 44.8,6.5 46.1,7.3 36.6,7.8 38.9,7.8 39.8,7.8 40.7,7.8 44.9,8.1 46.1,8.1 46.1,9 44.9,9.2 46.1,9.9 31,11.5 31.8,11.5 1,11.8 31,12.3 31.8,12.3 1,12.6 31,13.1 31.8,13.1 31,13.9 31.8,13.9 51.5,14.5 52.4,14.5 31,14.7 31.8,14.7 51.5,15.3 52.4,15.3 2.3,15.5 3.3,15.5 4.3,15.5 5.3,15.5 6.3,15.5 7.3,15.5 8.225,15.5 36.6,15.7 34.5,15.8 31.6,16.275 35.7,16.4 1.8,16.5 51.5,16.7 52.4,16.7 53.3,16.7 23.3,17.1 24.4,17.1 25.6,17.1 26.8,17.1 28,17.1 31.2,17.1 32.2,17.1 33.1,17.1 35.3,17.3 2.3,17.5 29.2,17.5 51.5,17.6 52.4,17.6 53.3,17.6 1.8,18.5 51.5,18.5 52.4,18.5 53.3,18.5 51.5,19.4 52.4,19.4 53.3,19.4 2.3,19.5 51.5,20.3 52.4,20.3 53.3,20.3 1.8,20.5 2.3,21.5 55.9,22.1 56.7,22.1 57.5,22.1 58.3,22.1 59.1,22.1 1.8,22.5 55.9,22.9 2.3,23.5 3.3,23.5 4.3,23.5 5.3,23.5 6.3,23.5 7.3,23.5 8.3,23.5 9.3,23.5 55.9,23.7 1.8,24.5 2.8,24.5 3.8,24.5 4.8,24.5 5.8,24.5 6.8,24.5 7.8,24.5 8.8,24.5 51.4,29.7 51.4,30.8 51.4,31.7
GPIO8: R2.1 U1.22 | length 2.3
  Top Layer w0.2: U1.22 11.95,22.9 12.85,22 R2.1
LED1: R1.1 U1.28 | length 7.3
  Top Layer w0.2: U1.28 7.7,25.7 7.7,25.921 9.879,28.1 12.24,28.1 12.94,28.8 12.965,28.8 13.315,29.15 R1.1
LED2: R9.1 U1.30 | length 5.6
  Top Layer w0.2: U1.30 6.1,25.7 6.1,25.927 6.769,26.596 7.371,26.596 9.573,28.798 9.573,28.825 R9.1
LED3: R12.1 U1.31 | length 4.1
  Top Layer w0.2: U1.31 5.2,27.95 6.4,29.15 R12.1
MCU_CLUTCH_EN: R19.1 U1.20 | length 61.7
  Top Layer w0.2: v1(10.005,21.254) 10.028,21.277 10.877,21.277 U1.20 ; v1(47.6,2.9) R19.1
  Bottom Layer w0.2: v1(10.005,21.254) 9.1,20.349 9.1,11.5 17.7,2.9 v1(47.6,2.9)
MOTOR_OUT1: D6.2 R34.1 U6.6 | length 5.3
  Top Layer w0.5: U6.6 56.81,17.465 57.8,16.475 D6.2 ; D6.2@57.83,16.18 R34.1@59.725,16.18
MOTOR_OUT2: D6.1 R35.1 U6.8 | length 4.7
  Top Layer w0.5: U6.8 57.555,20.005 D6.1 ; D6.1@57.827,20.277 R35.1@59.725,20.277
NetC4_2: C4.2 R4.1 R6.1 X1.1 | length 8.9
  Top Layer w0.2: C4.2 19.244,29.565 20.216,29.565 R4.1 20.859,29.548 21.732,29.548 R6.1 ; R6.1@22.047,29.254 22.8,30.007 X1.1
NetC5_2: C5.2 R5.2 R7.2 X2.1 | length 9.1
  Top Layer w0.2: C5.2@28.4,29.5 29.325,29.5 R5.2 29.875,29.5 30.825,29.5 R7.2 31.1,29.25 33.4,31.55 X2.1
NetC11_2: C11.2 R25.1 U3.5 | length 3.2
  Top Layer w0.2: U3.5 58.95,31.7 59.7,32.45 C11.2 59.901,32.349 60.926,32.349 R25.1
NetC23_2: C23.2 U5.10 | length 10.1
  Top Layer w0.2: v1(37.8,5) 37.8,6.15 C23.2 ; v1(41.475,10.891) 41.475,10.824 41.75,10.549 41.75,10.15 U5.10
  Bottom Layer w0.2: v1(37.8,5) 37.8,8.1 39.105,9.404 39.988,9.404 v1(41.475,10.891)
NetC24_2: C24.2 R29.1 | length 1.4
  Top Layer w0.2: C24.2 39.85,4.2 40.55,4.2 R29.1
NetC27_2: C27.2 R31.2 U1.6 U6.7 | length 59.4
  Top Layer w0.2: U1.6 6,13.6 6.8,12.8 14.3,12.8 19.8,18.3 v1(36.4,18.3) ; U6.7 55.55,18.735 55.998,18.286 56.414,18.286 v1(56.5,18.2)
  Bottom Layer w0.2: v1(36.4,18.3) 38.7,16 54.178,16 56.378,18.2 v1(56.5,18.2) ; C27.2 57.292,18.642 56.942,18.642 v1(56.5,18.2) ; R31.2 57.248,18.028 56.794,18.028 56.622,18.2 v1(56.5,18.2)
NetC28_2: C28.2 R32.1 R33.2 U6.4 | length 4.5
  Top Layer w0.2: R33.2 46.574,16.601 47.899,16.601 C28.2 ; C28.2@48,16.6 48.405,16.195 ; R32.1 48.405,15.12 48.405,16.195 ; U6.4 48.405,16.195
NetC29_1: C29.1 J5.1 R35.2 | length 6.5
  Top Layer w0.5: C29.1 61.564,18.963 61.564,20.161 R35.2 64.2,20.2 64.5,19.9 J5.1
NetC29_2: C29.2 J5.2 R34.2 | length 6.2
  Top Layer w0.5: R34.2 61.579,16.204 61.579,17.4 C29.2 ; R34.2@61.665,16.29 66.49,16.29 J5.2
NetC31_2: C31.2 J6.13 J6.14 J6.15 J6.16 R38.2
NetCR1_2: CR1.2 J1.2 Q1.3 | length 9.4
  Top Layer w0.5: CR1.2@60.5,7.68 60.61,7.57 60.61,6.801 Q1.3@61.668,5.743 ; CR1.2 60.5,8.09 60.61,8.2 65.648,8.2 66.248,8.8 J1.2 ; Q1.3@61.65,5.725 61.7,5.675 Q1.3
NetD1_K: D1.K R1.2 | length 1.7
  Top Layer w0.2: R1.2 D1.K
NetD2_K: D2.K R9.2 | length 1.8
  Top Layer w0.2: D2.K 9.923,32.352 R9.2
NetD3_K: D3.K R12.2 | length 1.8
  Top Layer w0.2: R12.2 D3.K
NetD4_A: D4.A J3.1 R15.2 R18.2 | length 8.2
  Top Layer w0.2: R15.2 13.586,10.939 13.586,10.467 13.9,10.154 13.9,9.85 D4.A ; J3.1 13.925,5.125 13.925,9.575 D4.A ; R18.2 14.873,11.1 14.522,10.75 14.522,10.322 14.05,9.85 D4.A
NetD5_2: D5.2 L2.2 U5.6 U5.7
NetD8_4: D8.4 U1.18 | length 32.6
  Top Layer w0.254: U1.18 11.1,19.7 12.4,21 39.283,21 41.75,23.467 D8.4
NetD8_6: D8.6 U1.17 | length 34.9
  Top Layer w0.254: U1.17 11.1,18.9 12.796,20.596 40.852,20.596 43.65,23.394 D8.6
NetJ2_1: J2.1 R13.2 | length 4.8
  Top Layer w0.2: J2.1 18.7,9.675 R13.2
NetJ2_2: J2.2 R14.1 | length 5.6
  Top Layer w0.2: R14.1 20.3,6.9 J2.2
NetJ6_A5: J6.A5 R36.2 | length 3.5
  Top Layer w0.2: J6.A5 44,28.726 44,28.1 44.6,27.5 44.6,26.75 45.4,25.95 R36.2
NetJ6_B5: J6.B5 R37.2 | length 4.1
  Top Layer w0.2: R37.2 40,26.401 40.95,27.351 J6.B5
NetL1_1: L1.1 U4.8 U4.9
NetL1_2: L1.2 U4.6 U4.7
NetQ1_1: Q1.1 R19.2 R21.2 | length 3.3
  Top Layer w0.2: R19.2 60.55,2.9 60.75,3.1 Q1.1
NetQ2_5: Q2.5 Q2.6 Q2.7 Q2.8 Q2.9 Q3.5 Q3.6 Q3.7 Q3.8 Q3.9
NetR22_2: R22.2 U2.2 | length 4.3
  Top Layer w0.2: R22.2 48.5,30.015 49.475,30.99 49.475,31.262 49.913,31.7 U2.2
NetR23_2: R23.2 U2.4 | length 3.2
  Top Layer w0.2: R23.2 50.1,28.45 49.601,28.949 49.601,30.554 49.946,30.9 U2.4
NetR24_2: R24.2 U2.9 | length 4.4
  Top Layer w0.2: U2.9 53.1,31.7 53.7,31.1 53.7,28.875 53.6,28.775 53.6,28.75 53.25,28.4 R24.2
NetR26_2: R26.2 U3.6 | length 2
  Top Layer w0.2: R26.2 57.075,33.325 58,32.4 58,32.24 58.04,32.2 U3.6
NetR27_1: R27.1 R28.2 U5.2 | length 4.1
  Top Layer w0.2: U5.2 R28.2 R27.1
NetR29_2: R29.2 U5.1 | length 2
  Top Layer w0.2: R29.2@40.8,5.525 41.15,5.875 41.15,6.2 41.8,6.85 U5.1
NetR30_2: R30.2 U1.19 U5.3 | length 51.4
  Top Layer w0.2: v1(10,19.9) 10.1,19.9 10.7,20.5 U1.19 ; U5.3 42.85,7.05 42.85,6.15 43.7,5.3 44.75,5.3 44.975,5.075 44.975,5.05 45.325,4.7 R30.2
  Bottom Layer w0.2: v1(10,19.9) 9.45,19.35 9.45,12.05 17.8,3.7 41.1,3.7 v1(43.2,5.8)
NetU1_24: U1.24 U6.3 | length 42
  Top Layer w0.2: U1.24 26.102,24.5 v1(29,21.602) ; v1(45.7,19.9) 47.4,19.9 48.65,18.65 48.65,18.332 49.026,17.956 49.026,17.69 49.251,17.465 U6.3
  Bottom Layer w0.2: v1(29,21.602) 30.702,19.9 v1(45.7,19.9)
NetU1_25: U1.25 U6.2 | length 44.6
  Top Layer w0.2: U1.25 10,26.705 10.645,27.35 15.255,27.35 17.605,25 26.5,25 29.898,21.602 v1(29.9,21.602) ; v1(46.5,20.5) 47.3,20.5 48.84,18.96 49.463,18.96 U6.2
  Bottom Layer w0.2: v1(29.9,21.602) 31.002,20.5 v1(46.5,20.5)
POT: C7.2 R14.2 R17.1 U1.15 | length 14.1
  Top Layer w0.2: U1.15 14.375,17.3 14.875,16.8 v1(14.9,16.8) ; v1(17.4,14.6) 17.4,14.5 19.125,12.775 R17.1 ; R14.2 R17.1 ; C7.2@21.402,12.5 21.128,12.775 R17.1
  Bottom Layer w0.2: v1(14.9,16.8) 16.334,15.366 16.665,15.366 17.4,14.631 v1(17.4,14.6)
POT_SUPPLY: R13.1 U1.16 | length 11.3
  Top Layer w0.2: U1.16 v1(12.8,18.1) ; v1(16.8,14) 18.8,12 R13.1
  Bottom Layer w0.2: v1(12.8,18.1) 12.8,18.05 16.8,14.05 v1(16.8,14)
REED: C8.2 R18.1 U1.12 | length 8.3
  Top Layer w0.2: U1.12 v1(13.1,14.9) ; v1(16.208,13.292) 16.208,13.17 16.4,12.978 16.4,12.3 16.4,11.175 R18.1
  Bottom Layer w0.2: v1(13.1,14.9) 14.6,14.9 v1(16.208,13.292)
USB_N: D8.1 J6.A7 J6.B7 | length 4.7
  Top Layer w0.283: J6.A7 42.459,28.768 42.459,28.13 42.679,27.91 42.69,27.91 43.45,27.15 ; J6.B7 43.45,27.15 ; D8.1 43.497,26.367 43.497,26.796 43.45,26.843 43.45,27.15
USB_P: D8.3 J6.A6 J6.B6 | length 5.3
  Top Layer w0.283: D8.3@41.75,26.229 41.75,27.321 41.943,27.514 J6.B6@41.943,28.769 ; J6.B6 41.95,29.55 42.092,29.692 42.834,29.692 42.951,29.575 J6.A6
USB_PG: R16.1 U1.13 U2.5 | length 49.2
  Top Layer w0.2: U1.13 12.716,15.7 13.116,16.1 v1(13.2,16.1) ; v1(30.2,23) 31.05,23 R16.1 31.65,22.9 v1(37,22.9) ; v1(50.3,29.7) 50.3,30.5 U2.5
  Bottom Layer w0.2: v1(13.2,16.1) 13.114,16.186 13.114,16.486 12,17.6 12,18.113 14.637,20.75 24.645,20.75 26.895,23 v1(30.2,23) ; v1(37,22.9) 43.5,22.9 v1(50.3,29.7)
VBAT_SENSE: C3.2 R3.1 R8.2 U1.5 | length 5.8
  Top Layer w0.2: U1.5 5.2,13.1 6.2,12.1 6.55,12.1 6.9,11.75 R8.2 7.175,12 8.2,12 9.2,12 R3.1
pads on no net: J6.A8 J6.B8 U1.4 U1.7 U1.21 U1.27 U1.29 U1.32 U1.33 U1.34 U1.35 U2.6 U3.1 U4.14

## Polygon pours and split planes (outlines as drawn)
GND on Top Layer "GND_L01_P034" (solid, remove dead copper, pour order 34): 0.2,26.3 0.2,13.1 11.6,13.1 11.6,26.3
NetD5_2 on Top Layer "NETD5_2_L01_P007" (solid, pour order 7): 43.2,9.7 43.2,10.5 44,11.3 44,18.9 45.3,18.9 45.3,11 44,9.7
GND on Top Layer "GND_L01_P023" (solid, pour order 23): 30.5,11.1 32.3,11.1 32.3,16.7 32.3,17.9 28.9,17.9 28.9,16.7 30.5,16.7
GND on Top Layer "GND_L01_P022" (solid, pour order 22): 22.3,14.9 22.3,17.9 28.9,17.9 28.9,14.9
GND on Top Layer "GND_L01_P029" (solid, pour order 29): 33.8,14.2 37.3,14.2 37.3,17.9 32.3,17.9 32.3,16.7 32.3,14.8 33.2,14.8
GND on Top Layer "GND_L01_P018" (solid, pour order 18): 54.2,7.7 54.2,4.7 54,4.5 54,3.6 56.2,3.6 56.2,4.5 56,4.7 56,7.7
GND on Top Layer "GND_L01_P016" (solid, pour order 16): 1.8,9.6 1.8,11 2.3,11.5 3,11.5 3,13.2 0.2,13.2 0.2,9.6
CELL+ on Top Layer "CELL+_L01_P002" (solid, pour order 2): 42.1,9.7 43,9.7 43,11.2 41,13.2 41,12.1 42.1,11
CELL+ on Top Layer "CELL+_L01_P001" (solid, pour order 1): 32.4,13.4 32.4,12 35.3,12 35.9,11.4 35.9,10.4 41,10.4 41,13.2 33.8,13.2 33.6,13.4
GND on Top Layer "GND_L01_P031" (solid, pour order 31): 51.9,30.5 51.9,30.8 52.8,30.8 52.8,31 51.9,31 51.9,32.1 51.4,32.7 51.4,34.6 50.5,34.6 50.5,32.6 50.9,32.2 50.9,31.4 50,31.4 50,31.2 50.9,31.2 50.9,29.3 51.9,29.3
GND on Top Layer "GND_L01_P026" (solid, pour order 26): 43.2,7.7 43.2,6.5 44.2,6.2 44.2,5.6 46.3,5.6 48,5.6 48.1,5.6 48.1,5.9 45.7,5.9 45.7,6.5 44.5,7.7
+3V3 on Top Layer "+3V3_L01_P030" (solid, pour order 30): 3.4,12.8 4.8,12.8 4.8,9.6 3.4,9.6
GND on Top Layer "GND_L01_P025" (solid, pour order 25): 30.5,13.9 29.5,13.9 29.5,13.5 30.5,13.5
GND on Top Layer "GND_L01_P024" (solid, pour order 24): 33.3,13.9 32.3,13.9 32.3,13.5 33.3,13.5
GND on Top Layer "GND_L01_P021" (solid, pour order 21): 58.8,23.4 58.8,22.6 59,22.4 59.5,22.4 59.5,21.7 55.3,21.7 55.3,24.1 56.3,24.1 57,23.4
GND on Top Layer "GND_L01_P019" (solid, pour order 19): 48.7,19.5 50.3,19.5 50.8,19 50.8,14 53.8,14 53.8,20.7 53.7,20.7 48.7,20.7
GND on Top Layer "GND_L01_P017" (solid, pour order 17): 35.9,9.4 35.9,7.4 41.2,7.4 41.5,7.7 44.5,7.7 45.7,6.5 45.7,5.9 48.1,5.9 48.1,10.3 45.1,10.3 44.2,9.4
+12V on Top Layer "+12V_L01_P008" (solid, pour order 8): 51,10.704 67.5,10.7 67.5,13.2 65.967,13.2 65.469,12.604 51,12.6
CELL+ on Top Layer "CELL+_L01_P015" (solid, pour order 15): 52.1,32 52.8,32 52.8,33.7 52.1,33.7
+3V3 on Top Layer "+3V3_L01_P003" (solid, pour order 3): 30.4,13.4 22.3,13.4 22.3,10.6 28.921,10.6 28.921,12 30.4,12
NetL1_2 on Top Layer "NETL1_2_L01_P005" (solid, pour order 5): 30.3,11.8 30.3,6.2 28.1,6.2 28.1,9.3 29.5,10.7 29.5,11.8
NetL1_1 on Top Layer "NETL1_1_L01_P006" (solid, pour order 6): 32.5,11.8 32.5,6.2 34.7,6.2 34.7,9.3 33.3,10.7 33.3,11.8
+12V on Top Layer "+12V_L01_P009" (solid, pour order 9): 54.4,16.5 54.4,14.2 54.4,13 54.4,12.6 55.9,12.6 55.9,16.5
+12V on Top Layer "+12V_L01_P010" (solid, pour order 10): 49.5,5.9 49.5,13.4 51,13.4 51,5.9
NetQ2_5 on Top Layer "NETQ2_5_L01_P011" (solid, pour order 11): 56.9,29.2 56.9,23.9 59.5,23.9 59.5,29.2
CELL- on Top Layer "CELL-_L01_P012" (solid, pour order 12): 57.678,29.8 59.672,29.8 59.672,31.4 57.9,31.4 57.9,30.9 57.678,30.7
+3V3 on Top Layer "+3V3_L01_P004" (solid, pour order 4): 3.4,13.5 3.8,13.5 3.8,9.6 3.4,9.6
+V_USB on Top Layer "+V_USB_L01_P000" (solid, pour order 0): 50.7,32 49.6,32 49.6,32.6 50.3,32.6 50.7,32.2
+3V3 on Power "+3V3_L03_P014" (solid, pour order 14): 3.4,12.2 4.8,12.2 4.8,9.6 3.4,9.6
+3V3 on Power "+3V3_L03_P013" (solid, pour order 13): 28.9,13.4 28.9,10.3 28.8,10.4 22.3,10.4 22.3,13.4
NetC31_2 on Bottom Layer "NETC31_2_L04_P028" (solid, pour order 28): 38.1,35.5 38.1,28.2 47.3,28.2 47.3,35.5
GND on GND "GND_L02_P032" (solid, pour order 32): 0,35.5 0,0 71.5,0 71.5,35.5

## Silkscreen, mask and mechanical layers (free items; w line width, h text height)
Top Overlay:
  drawing of 24 lines, arcs and shapes, not listed
  text "BAT+" at 71,26.5 h1 r90
  text "BAT-" at 71,23 h1 r90
  text "BOOT" at 19.2,22.211 h1
  text "Janus v1.1" at 23.1,19.318 h1.52
  text "Marcel Lis" at 23.1,18.51 h1
  text "09.11.2026" at 27.5,18.511 h1
  text "EN" at 18.3,16.4 h1
  text "MOTOR-OUT" at 70.989,15.6 h1 r90
  text "+12V" at 71,11.2 h1 r90
  text "CLUTCH" at 70.989,6.7 h1 r90
  text "GND" at 9.3,0.511 h1
  text "REED" at 12.6,0.5 h1
  text "POT-PWR" at 16.6,0.511 h1
  text "POT" at 21.5,0.511 h1
  text "GND" at 24.8,0.511 h1
Mechanical 1:
  the board outline again, w0.254